# Altium PCB TZ-SB-0001-PCB-[A] (HydroScope Mainboard).PcbDoc (part 3 of 4)
Units mil, origin at the board's own origin, x right, y up, seen from the top; angles counter-clockwise.
Board outline 4500 x 970 mil, 4 copper layers (Top Layer, GND-PWR, GND, Bottom Layer), stack 64.112 mil thick; 165 components, 114 nets, 573 pads, 320 vias.
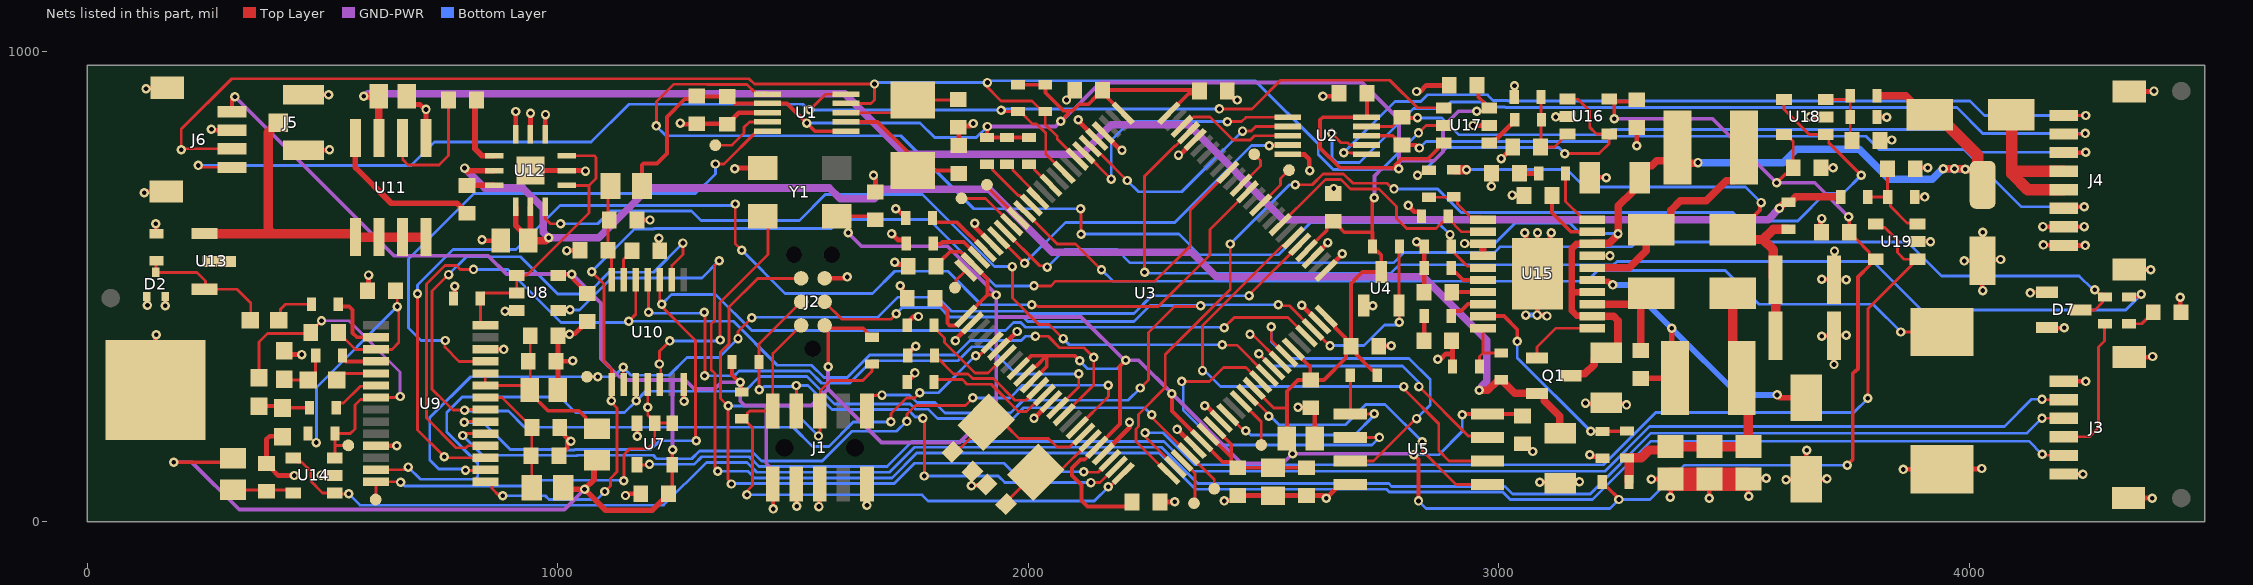
[diagram p4: the nets of this part, all layers, seen from the top]

## Via types
v1: diameter 20, hole 10, Top Layer to Bottom Layer, tented both sides, 320 vias

## Nets (pads, with @x,y where several pads share a name; then routed paths per layer and width w, separated by ;. In a path a pad name is that pad's centre, name@x,y a point inside that pad or via, vN(x,y) a via of type N, cw(c..) or ccw(c..) an arc to the next point about the centre after c; other vN are vias at no path point)
+3.3v: C1.2 C2.2 C3.2 C6.1 C7.2 C8.2 C9.2 C10.2 C11.2 C12.2 C13.2 C14.2 C16.2 C18.2 C19.2 C20.2 C21.2 C22.2 C23.2 C58.2 C59.2 C62.2 C63.2 J1.1 J2.1 J6.4 L1.1 L2.2 L3.1 L4.2 R2.2 R3.2 R4.1 R5.1 R6.1 R8.2 R9.2 R15.2 R16.2 R17.2 R27.1 U1.1 U1.7 U2.10 U3.1 U3.9 U3.10 U3.11 U3.21 U3.31 U3.32 U3.33 U3.39 U3.45 U3.50 U3.54 U3.75 U3.76 U3.99 U4.3 U5.8 U7.5 U8.5 U16.5 U17.3 U17.6 U18.5 U19.5 Y1.4 | length 15735.5
  Top Layer w6: U3.39@2479.67,283.17 2521.37,241.47 2549.47,241.47 ; U18.5@3605.71,822.6 3610.63,822.6 3625.46,807.77 C62.2@3625.46,752 ; C63.2@3744.54,615 3744.54,613.03 3757.29,600.28 3759.25,600.28 3786.98,572.56 3786.98,566.41 3795.79,557.6 U19.5@3800.71,557.6
  Top Layer w8: v1(184,126) 301.67,126 L4.2@310,134.33 ; J6.4@307.64,871.06 307.64,896.64 v1(314,903) ; U8.5@1001.29,523.4 1002.89,525 1029,525 v1(1030,526) ; L3.1@1011.46,72 L3.1@1027.43,87.97 ; 1032.3,515.24 1049.28,498.25 1049.28,496.29 1061.03,484.54 C23.2@1063,484.54 ; L2.2@1179,713 1179,758 1182,761 1211,761 1232,782 1232,860 1269.97,897.97 1288.43,897.97 C2.2@1295,904.54 1296,903.54 C1.2@1360,903.54 1361.97,903.54 1376.82,888.68 U1.7@1445.34,888.68 1487.31,888.68 v1(1529,847) 1546.37,829.63 U1.1@1612.66,829.63 ; C22.2@1235.54,59 1243.4,66.86 U7.5@1243.4,120.71 1243.4,147.4 1244,148 v1(1244,152.79) ; R16.2@1370.46,338.85 1370.46,311.54 1389.3,292.7 1389.3,277.24 R17.2@1391,275.54 ; J1.1@1457,80 1458,79 v1(1458,27) ; v1(1575,329) 1575,402.78 1567,410.78 J2.1@1567,417 1573.22,417 1579.45,410.78 1648.77,410.78 1656.7,402.84 1656.7,397.92 1662.54,392.08 R15.2@1667.46,392.08 ; v1(1617,614) 1617,627.41 1595.41,649 1667.46,649 C3.2@1675,641.46 ; C7.2@1801.54,475 1801.54,473.03 1813.29,461.28 1815.25,461.28 1828,448.54 1828,421.57 1832.69,416.89 1845.13,416.89 1864.52,436.28 U3.1@1867.22,436.28 1913,482.07 ; C14.2@1814.54,541 1814.54,554.72 1833.39,573.57 1855.2,573.57 U3.99@1881.14,547.64 1913,515.77 1913,482.07 ; v1(1913,839.69) 1912,838.69 R4.1@1912,816.54 R5.1@1955,816.54 R6.1@2001,816.54 ; v1(1932,481.54) 1931.47,482.07 1913,482.07 ; R3.2@1978,928.54 R2.2@2036,928.54 2036.61,927.93 2036.61,911.39 2070,878 2070,877.69 2074.69,873 2084.34,873 ; U3.9@1978.57,324.93 2006.41,352.77 2039,352.77 ; U3.10@1992.49,311.01 1995.19,311.01 2014.17,330 2016.23,330 2039,352.77 ; U3.11@2006.41,297.09 2039,329.68 2039,352.77 ; v1(2069,851) 2084.34,866.34 2084.34,873 ; v1(2109,342) 2098.23,352.77 2039,352.77 ; U3.76@2201.28,867.78 2169.29,899.78 2169.29,903.28 C13.2@2157.54,915.03 ; v1(2207,343) 2195,331 2195,207.29 U3.21@2145.6,157.89 2119.71,132 2110.72,132 2093,114.28 2093,98.11 2113,78.11 2113,44.72 2125.72,32 2220.46,32 C8.2@2220.46,50.39 ; U3.75@2298.72,867.78 2340.4,909.47 2357.93,909.47 C12.2@2363.46,915 2361.46,917 C13.2@2157.54,917 C13.2@2157.54,915.03 ; v1(2305,272) 2305,235.28 2336,204.28 2336,204.13 U3.31@2368.32,171.81 2413.13,127 2426.6,127 2427.31,126.29 C9.2@2431.28,126.29 ; U3.32@2396.15,171.85 2431.28,136.72 ; U3.33@2396.15,199.65 2431.28,164.52 2431.28,136.72 ; v1(2561.47,144.1) 2561.47,165.01 C20.2@2549.47,177 2549.47,241.47 2549.47,277.28 2573.19,301 C21.2@2600,301 ; U3.45@2563.19,366.68 2563.19,364.81 2597,331 2599,331 2599,302 C21.2@2600,301 ; C19.2@2591.03,114.54 C18.2@2520,114.53 C9.2@2445,114.54 2433.25,126.29 C9.2@2431.28,126.29 ; U3.54@2591.03,575.48 2591.03,576.24 2616,601.22 2616,601.28 2627.72,613 2628.55,613 2634.28,618.73 2634.28,626.71 2646.03,638.46 C11.2@2648,638.46 2649.97,638.46 2661.72,626.71 2661.72,624.75 2671.46,615 2731,615 ; U3.50@2632.78,436.28 2632.78,433.59 2651.48,414.9 2651.48,412.24 2673.71,390.01 2673.71,384.13 C10.2@2685.46,372.39 ; C6.1@2719.52,910 2719.52,860.23 U2.10@2718.66,859.37 2718.5,859.53 2625.53,859.53 2620,854 2620,794.03 2662.03,752 2773.64,752 2773.95,751.69 2785.74,751.69 v1(2787.4,750.03) ; 2731,616 2731,683.7 v1(2735.3,688) ; 2731.46,614.54 R8.2@2731.46,585 2731.46,580.08 2737.3,574.24 2742.22,574.24 2750,566.46 U4.3@2750,530.43 2709.57,530.43 2685.46,506.33 C10.2@2685.46,372.39 ; R9.2@2741.14,311.01 2741.14,315.93 2735.3,321.77 2730.38,321.77 2697.21,354.94 2697.21,360.64 C10.2@2685.46,372.39 ; 2779.54,757.9 2792.64,771 2849.17,771 2870.04,791.87 2870.04,796.79 2877.85,804.6 U17.6@2882.77,804.6 ; v1(2819,142) 2829,132 v1(2829,44) ; v1(2922,227) 2924,229 U5.8@2975.67,229 3045.54,229 C16.2@3050,224.54 ; C58.2@2953.54,927 2956.66,923.88 2956.66,901.97 2966.5,892.13 2966.5,887.21 U17.3@2974.31,879.4 ; R27.1@3219.46,84 3219.46,79.08 3225.3,73.24 3230.22,73.24 3255,48.46 v1(3255,47) ; U16.5@3234.29,893 U16.5@3245,893 ; v1(3245,856) U16.5@3245,893 ; C59.2@3293,896.54 3289.46,893 U16.5@3245,893 ; v1(3590,720) 3608.28,738.28 3613.71,738.28 3625.46,750.03 C62.2@3625.46,752 ; v1(3740,120) 3752,132 3752,315 3757,320 3758.31,320 3763,324.69 3763,519.89 3787.98,544.87 3787.98,549.79 U19.5@3795.79,557.6 ; v1(3743,648) 3743,646 3744.54,644.46 C63.2@3744.54,615 ; 2084.34,873 2094,873 2108,887 2127.54,887 2143.82,903.28 2145.79,903.28 C13.2@2157.54,915.03 ; C9.2@2431.28,126.29 2431.28,136.72 ; C21.2@2600,301 2628,301 2675.21,348.21 2675.21,362.13 C10.2@2685.46,372.39
  Top Layer w12: L3.1@1011.46,72 1014.46,69 v1(1057,69) ; L1.1@1083,130.54 1077.09,130.54 1077.09,89.09 v1(1057,69) ; C22.2@1235.54,59 1235.54,57.03 1225.79,47.28 1223.82,47.28 1200.54,24 1102,24 v1(1057,69)
  GND-PWR w8: v1(184,126) 223,126 323,26 1014,26 v1(1057,69) ; v1(314,903) 652,565 852,565 891,526 v1(1030,526) 1092,464 1092,346.72 1130.72,308 1136,308 1143,301 1244,301 ; v1(1244,152.79) 1244,301 ; v1(1458,27) 1458,109 1443,124 1443,246 ; v1(1575,329) 1574,328 1574,282 ; v1(1617,614) 1646,585 1828.54,585 v1(1932,481.54) 1932,435 ; v1(1913,839.69) 2057.69,839.69 v1(2069,851) 2071,851 2153,933 2709,933 2787.4,854.6 2787.4,767 ; v1(2735.3,688) 2735.3,734.33 2751,750.03 v1(2787.4,750.03) 2787.4,767 ; v1(2819,142) 2816.9,144.1 v1(2561.47,144.1) 2541.37,124 2453,124 v1(2305,272) 2234,343 v1(2207,343) 2204,343 2112,435 1932,435 ; v1(2953,872) 2914,872 2881,839 2881,786 2862,767 2787.4,767 ; v1(3245,856) 3454,856 v1(3590,720) 3671,720 v1(3743,648) ; 1244,301 1271,301 1290,282 1333.23,282 1347.23,296 v1(1388,296) 1388,256 1397,247 1442,247 1443,246 ; 1443,246 1443,247 1539,247 1574,282 ; 1574,282 1688,168 1854,168 1932,246 1932,435
  Bottom Layer w6: v1(1529,847) 1770,847 1801,816 1889.31,816 v1(1913,839.69) ; v1(2109,342) 2126,325 2189,325 v1(2207,343) ; v1(2819,142) 2872,142 2922,192 v1(2922,227) ; v1(2829,44) 2845,28 3236,28 v1(3255,47) 3321,47 3394,120 v1(3740,120)
+3.3v+_TDC1000: C24.2 C25.2 C26.2 L1.2 U9.23 U9.24 | length 423.2
  Top Layer w6: U9.24@846,314.95 U9.23@846,289.36 846.21,289.57 930.9,289.57 C26.2@940.47,280 941.46,280.99 941.46,341 C25.2@941.46,395
  Top Layer w8: C26.2@940.47,280 940.47,274.09 978.94,235.62 1044.84,235.62 1059.44,221.02 1059.44,215.12 1077.09,197.46 L1.2@1083,197.46
+3.3v+_TDC7200: C27.2 C28.2 L2.1 U10.14 | length 204.6
  Top Layer w6: L2.1@1112.07,713 1106.54,707.47 C27.2@1106.54,577 1114.43,569.1 U10.14@1114.43,514
+HV: C29.2 R24.1 R41.2 U11.3 | length 3443.2
  Top Layer w16: v1(588,904) C29.2@619.94,904 620,903.94 U11.3@620,815.31 ; v1(3596,665.94) 3606.76,676.7 3613.16,676.7 R24.1@3615,678.54 3619.92,678.54 3621.76,680.39 3621.76,680.63 3631.14,690 R41.2@3726.46,690
  GND-PWR w16: v1(588,904) 591,904 596,909 1610,909 1738,781 2114,781 2176,843 2341,843 2542,642 3572.06,642 v1(3596,665.94)
+HV_PRE: C44.1 C47.2 D4.2 R24.2 R25.2 | length 1125.9
  Top Layer w8: D4.2@3496.61,620 3512.36,620 3554.7,662.34 3554.7,675.7 v1(3557,678)
  Top Layer w20: R25.2@2904,747.54 2930.54,747.54 v1(2931,748) ; D4.2@3496.61,620 3516.97,599.64 3561.36,599.64 ; C44.1@3587.99,395 C47.2@3587.99,514 3583.31,518.68 3583.31,577.69 3561.36,599.64 ; R24.2@3615,621.46 3583.17,621.46 3561.36,599.64
  Bottom Layer w6: v1(2931,748) 3145,748 3182,711 3524,711 v1(3557,678)
+MOS_DRV: C40.2 C57.2 Q1.2 R35.2 U12.8 U12.10 U12.11 | length 3087.4
  Top Layer w12: v1@808.44,746 U12.8@865.23,746 ; U12.10@910.5,669.23 910.5,629.93 937.53,602.91 C40.2@937.53,597 942,601.47 U12.11@942,669.23
  Top Layer w16: v1(802,751.36) 803.08,751.36 v1@808.44,746 ; C40.2@937.53,597 973.92,597 979.92,603 v1(981,603) ; v1(2958,279) 2976.67,279 2997.28,299.61 3003.16,299.61 R35.2@3005,301.46 3009.92,301.46 3011.76,299.61 3011.76,294.69 3033.86,272.6 Q1.2@3081.11,272.6 3092.92,272.6 3096.73,268.79 3096.73,256.98 3129.28,224.43 3129.28,188.87 C57.2@3130,188.15
  GND-PWR w16: v1(802,751.36) 844.36,709 926,709 969,666 969,615 v1(981,603) 1087,603 1193,709 1577,709 1600,686 1673,686 1693,706 1917,706 2051,572 2347,572 2399,520 2839,520 2974,385 2974,298.36 2963.39,287.75
+V_ADJ: R26.1 U16.1 U16.4 | length 637.5
  Top Layer w6: v1(2827,736) 2831,736 2839.93,744.93 2838.33,746.54 R26.1@2851,746.54 ; v1(3140,782) 3213,782 3234.29,803.29 U16.4@3234.29,823.6 3207.4,823.6 3192.85,838.15 3192.85,872.54 3167.93,897.47 3146.64,897.47 U16.1@3145.71,898.4
  Bottom Layer w6: v1(2827,736) 2831,736 2890,795 3127,795 v1(3140,782)
+VIN: D3.1 J4.4 J4.5 | length 361.3
  Top Layer w24: D3.1@4088.61,865 4090,863.61 4090,806 4090,744.68 ; J4.5@4200.36,705.31 4123.69,705.31 4090,739 4090,744.68 ; J4.4@4200.36,744.68 4090,744.68
BUFFERED_RX: J3.3 U14.1 U14.4 | length 3993
  Top Layer w6: U14.4@437.71,135.51 446.52,126.7 455.76,126.7 475,107.46 475,86 500.3,60.7 U14.1@526.29,60.7 528,59 v1(556,59) ; v1(4154,220) 4154.32,219.68 J3.3@4200.36,219.68
  Bottom Layer w6: v1(556,59) 580,35 1224.97,35 1315.97,126 1401.93,126 1422.93,105 1704.97,105 1757.97,158 2282.97,158 2360.11,80.86 2766.05,80.86 2771.91,75 3013,75 3029,59 3194.03,59 3323.03,188 4122,188 v1(4154,220)
BUFFERED_STOP: J3.2 U7.4 | length 3159.6
  Top Layer w6: U7.4@1168.6,120.71 1193.71,120.71 v1(1195,122) ; v1(4154,260) 4154.94,259.05 J3.2@4200.36,259.05
  Bottom Layer w6: v1(1195,122) 1195.21,121.79 1289.82,121.79 1306.03,138 1406.9,138 1427.9,117 1700,117 1753,170 2287.94,170 2350.94,107 3225.06,107 3320.06,202 4074,202 4132,260 v1(4154,260)
BZR: U3.91 U6.1 | length 2074.2
  Top Layer w6: U3.91@1992.49,658.99 2061.5,589.98 2100.51,589.98 v1(2155.49,535) ; v1(3854,403) 3854.33,402.67 U6.1@3942,402.67
  Bottom Layer w6: v1@2156,535 2180,511 3187,511 3210,534 3481,534 3553,462 3795,462 v1(3854,403)
CS_TDC1000: U3.18 U9.19 | length 1652.2
  Top Layer w6: v1(798,183) 802,187 U9.19@846,187 ; v1(1742,213) 1742,229 1760,247 1866.13,247 1882,262.87 v1(1882,263) ; U3.18@2103.85,199.65 2170,265.81 v1(2170,290)
  Bottom Layer w6: v1(798,183) 840,141 1014.16,141 1015.16,140 1040.84,140 1041.84,141 1202.87,141 1210.08,133.79 1284.85,133.79 1301.06,150 1411.87,150 1432.87,129 1561.97,129 1624.97,192 1720.13,192 1741.13,213 v1(1742,213) ; v1(1882,263) 1961,263 1988,290 v1(2170,290)
CS_TDC7200: U3.15 U10.11 | length 1282.8
  Top Layer w6: U10.11@1191.2,514 1193,512.2 v1(1193,445) ; v1(1311,445) 1313,443 v1@1313,310 ; U3.15@2062.09,241.41 2107,286.32 v1(2107,314)
  Bottom Layer w6: v1(1193,445) 1195,443 1309,443 v1(1311,445) ; v1(1312,310) 1375.13,310 1385.49,320.36 1534.58,320.36 1560.94,294 1620,294 1668,342 1850.36,342 1880.13,371.77 1916.23,371.77 1974,314 v1(2107,314)
DC_DC_SYNC: R32.2 U1.6 U15.5 | length 2299.5
  Top Layer w6: v1(1209,840.86) 1210,841.86 1210,893 1246.29,929.29 1316.73,929.29 1317.01,929 1402,929 1419.72,911.28 1442.43,911.28 U1.6@1445.34,908.37 ; v1(2111,665) 2112,664 v1(2112,611) ; v1(2896,610) 2897,609 2897,586.54 R32.2@2898.54,585 2905.39,578.16 2905.39,570.4 2932.92,542.86 2962.2,542.86 U15.5@2965.97,539.09
  Bottom Layer w6: v1(1209,840.86) 1229.86,820 1728.97,820 1883.97,665 v1(2111,665) ; v1(2112,611) 2320,611 2364,567 2531,567 2600,636 2870,636 v1(2896,610)
DC_DC_VIN: C45.2 C46.2 C48.1 D3.2 L5.1 Q1.3 R39.2 U15.3 U15.4 U15.12 U15.14 U15.18 | length 2359.2
  Top Layer w8: v1(2927,591) 2930,591 2930.72,590.28 U15.3@2965.97,590.28
  Top Layer w14: U15.12@3197.39,437.59 3165.41,437.59 3155,448 3155,487.4 ; U15.14@3197.74,487.4 3155,487.4 ; U15.18@3198.25,590.28 3164.68,590.28 3155,580.59 3155,487.4
  Top Layer w16: U15.4@2965.97,564.68 U15.3@2965.97,590.28 ; Q1.3@3151.98,310 3155.79,313.81 3182.66,313.81 3202.54,333.68 3202.54,345.5 3216.19,359.15 C45.2@3228,359.15 3239.35,359.15 3253,372.8 3253,427.36 3243.63,436.73 U15.12@3198.25,436.73 U15.12@3197.39,437.59 ; U15.14@3197.74,487.4 U15.14@3198.25,487.91 ; U15.18@3198.25,590.28 3199.11,591.13 3234.13,591.13 3254,611 3254,671 3285.5,702.5 3285.5,717.35 C46.2@3299.15,731 3299.15,742.81 3312.8,756.46 3324.61,756.46 3334.98,766.83 3357.61,766.83 L5.1@3379.13,788.36 ; L5.1@3379.13,795 L5.1@3379.13,788.36 ; v1(3423,763) 3422,762 3400.66,762 3379.13,783.53 L5.1@3379.13,788.36 ; R39.2@3803.54,905 3864.8,905 3874.17,895.63 3874.17,890.46 3899.64,865 D3.2@3915.39,865 ; v1(3944,750) v1(3968,750) 3988.92,750 3989.92,749 v1(3991,749) 3991.77,748.23 4008.88,748.23 C48.1@4008.88,752.18 ; C48.1@4028,715.71 C48.1@4028,733.06
  Top Layer w24: D3.2@3915.39,865 3931.13,865 3952.6,843.54 3952.6,843.4 4017.36,778.64 4017.36,726.35 C48.1@4028,715.71
  Bottom Layer w6: v1(2927,591) 2991,591 3034,634 3150.73,634 3172.73,612 v1(3253,612)
  Bottom Layer w16: v1(3423,763) 3604.33,763 3632.33,791 3766,791 3829,728 3920.94,728 3942.94,750 v1(3944,750) v1(3968,750) 3993.97,750 3992.97,749 v1(3991,749)
FLOAT: U13.2
GND: C1.1 C2.1 C3.1 C4.1 C5.1 C6.2 C7.1 C8.1 C9.1 C10.1 C11.1 C12.1 C13.1 C14.1 C15.1 C16.1 C17.1 C18.1 C19.1 C20.1 C21.1 C22.1 C23.1 C24.1 C25.1 C26.1 C27.1 C28.1 C29.1 C30.2 C31.1 C32.1 C37.1 C40.1 C41.2 C42.1 C43.1 C44.2 C45.1 C46.1 C47.1 C48.2 C50.1 C51.1 C52.1 C53.1 C54.1 C55.1 C56.1 C57.1 C58.1 C59.1 C60.1 C61.1 C62.1 C63.1 C64.1 D1.C D2.1 D2.2 D6.1 D7.1 D7.2 HW1.1 J1.3 J1.5 J1.9 J2.5 J3.1 J3.6 J3.M1 J3.M2 J4.7 J4.8 J4.M1 J4.M2 J5.1 J5.2 J6.3 J6.M1 J6.M2 R10.1 R11.1 R12.1 R13.1 R14.1 R18.2 R23.1 R29.1 R30.1 R31.1 R32.1 R36.1 R38.1 R40.1 R42.1 U1.8 U2.5 U3.2 U3.6 U3.14 U3.22 U3.30 U3.34 U3.43 U3.49 U3.51 U3.53 U3.71 U3.79 U3.80 U3.96 U4.1 U5.4 U6.2 U7.3 U8.3 U9.11 U9.26 U10.7 U11.1 U12.2 U12.4 U12.5 U12.6 U12.13 U14.2 U15.17 U15.21 U16.2 U17.2 U18.2 U19.2 Y1.2 | length 7168.9
  Top Layer w6: v1(2471,398) 2476.19,398 U3.43@2535.35,338.85
  Top Layer w10: v1(121,699) 122,699 123.79,700.79 167.39,700.79 J6.M1@168.36,701.76 ; v1(125,920) 125.76,920.76 168.85,920.76 J6.M2@170.33,922.24 ; D2.1@126.31,478.41 127.52,477.21 127.52,460.48 v1(128,460) ; HW1.1@145,280 145,395 v1(147,397) ; v1(146,633) 147,632 R23.1@147,611.54 ; D2.2@165.68,478.41 166.2,477.89 166.2,459.2 v1(166,459) ; v1(264,834) 266.31,831.69 J6.3@307.64,831.69 ; C37.1@419,355 v1(456,355) ; C41.2@425.75,192.21 415,181.46 387.86,181.46 381,174.6 C43.1@381,123.52 382.97,123.52 393.72,112.77 393.72,110.8 406.52,98 v1(440,98) ; J5.2@459.57,788.94 513.94,788.94 v1(515,790) ; J5.1@459.57,907.06 459.63,907 v1(513,907) ; v1(497,99) 497.89,98.11 U14.2@526.29,98.11 ; C42.1@596,491 598,493 v1(598,524) ; U9.11@613.72,161.41 657.59,161.41 v1(658,161) ; C29.1@679,904 679,900.94 693.69,886.26 707.74,886.26 v1@720,874 ; U11.1@720,815.31 v1@720,874 ; v1(720,876) v1@720,874 ; R18.2@778.46,474 781,476.54 v1(781,500) ; v1(839,599) 841,599 843,597 C40.1@878.47,597 ; U9.26@846,366.13 884.87,366.13 v1(885,366) ; v1(888,447) 911.11,447 U8.3@912.71,448.6 ; U12.6@910.5,822.77 v1(910.5,871.5) ; U12.13@942,746 U12.2@1018.77,746 1058,746 v1(1059,745) ; U12.5@942,822.77 v1(942,868) ; U12.4@973.5,822.77 973.5,864.5 v1(974,865) ; C24.1@996.52,341 C24.1@1000.52,341 ; C26.1@999.53,280 1000.52,280.99 C24.1@1000.52,341 ; C32.1@1002.52,140 1020,157.48 1020,171 v1(1028,171) ; C31.1@1004.03,200 1014.78,189.25 1014.78,182.93 1020.09,177.62 v1@1020.09,171.09 ; v1(1019,576) 1046.48,576 C27.1@1047.48,577 ; v1(1032,342) 1031,341 C24.1@1000.52,341 ; C23.1@1063,425.48 1061.03,425.48 1050.28,414.73 1050.28,412.77 1037.43,399.91 1026.91,399.91 v1(1025,398) 1003.52,398 C25.1@1000.52,395 C24.1@1000.52,341 ; v1(1144,55.47) 1147.53,59 C22.1@1176.48,59 ; C28.1@1168.52,641 v1(1196,641) v1@1197,640 ; U7.3@1168.6,209.29 1168.6,182.4 1169,182 v1(1169,181.46) ; v1(1215,602) 1214,601 1214,578.01 C30.2@1216.54,575.48 ; v1(1260,847) 1261.91,845.09 1268.4,845.09 1269,844.48 1294,844.48 C2.1@1295,845.48 1359,845.48 C1.1@1360,844.48 1361.97,844.48 1372.72,855.23 1372.72,857.2 1384.52,869 U1.8@1445.34,869 ; U10.7@1267.98,291.56 1267.98,256.42 v1(1268.4,256) ; v1(1376,750.03) 1377.33,751.36 Y1.2@1435.52,751.36 ; J1.3@1507,80 1507.64,79.36 1507.64,33.36 v1(1508,33) ; v1(1555,32) 1556.36,33.36 1556.36,79.36 J1.5@1557,80 ; J2.5@1567,517 1612,517 v1(1615,520) ; v1(1657,35) 1659,37 1659,78 J1.9@1657,80 ; v1(1671,736) 1675,732 C3.1@1675,700.52 ; v1(1709.28,611.72) 1722.46,598.54 1735.9,598.54 1740.74,593.7 R10.1@1740.74,591 ; v1(1716.13,550.97) 1720.72,546.38 1741.2,546.38 C14.1@1744.61,542.97 ; v1(1718,665.07) 1719.46,665.07 1729.69,654.84 1734.61,654.84 1739.46,649.99 R11.1@1739.46,645.07 ; v1(1728,501) 1731.73,497.27 1731.73,485.75 C7.1@1742.48,475 ; R13.1@1742.46,297 1759,313.54 v1(1759,316) ; R14.1@1742.46,417.31 1742.46,422.24 1756.22,436 v1(1766.46,436) ; R12.1@1743.46,353 1743.46,357.92 1748.3,362.76 1750.14,362.76 1760.38,373 v1(1761,373) ; v1(1845.09,384.54) 1845.09,386.31 U3.2@1881.14,422.36 ; C4.1@1852,799.06 1852,837.27 C5.1@1851,838.27 1853.59,840.86 1877.86,840.86 v1(1883,846) ; v1(1879,76) 1880.48,77.48 1909.74,77.48 C15.1@1911.13,78.87 ; v1(1886,634) 1886,626.29 U3.96@1922.89,589.4 ; U3.6@1936.81,366.68 1938.09,366.68 1957.73,386.32 1958.32,386.32 v1(1976,404) ; v1(2012,220) 2013,221 2013.84,221 U3.14@2048.17,255.33 ; v1(2081,896) 2081,897 2087.73,903.73 2087.73,906.25 C13.1@2098.48,917 ; v1(2106,853.86) 2106,851.71 U3.80@2145.6,812.11 ; U3.22@2159.52,143.97 2214.82,199.27 2214.82,210.82 v1(2215,211) ; U3.79@2159.52,826.03 2196.55,789 v1(2199,789) ; C8.1@2279.43,41.61 2310.31,41.61 v1(2310.91,42.21) ; v1(2316,196) 2316.29,196 U3.30@2354.4,157.89 ; v1(2319,779) 2321.29,779 U3.71@2354.4,812.11 ; v1(2375,246) 2377.64,246 U3.34@2410.07,213.57 ; v1(2416,44) 2420,44 2420.9,44.9 2434.42,44.9 C9.1@2445,55.48 ; C12.1@2422.52,915 2422.52,913.03 2437.64,897.91 2442.09,897.91 v1(2444,896) ; C9.1@2445,55.48 C18.1@2520,55.47 ; C18.1@2520,55.47 C19.1@2591.03,55.48 2627.16,55.48 v1(2632.78,49.86) 2653.9,70.97 2653.9,72.19 2660.71,79 U5.4@2684.33,79 ; U2.5@2551.34,780.63 2551.65,780.31 2586.69,780.31 2597,770 2597,747 v1(2598,746) ; v1(2573,243) 2573.14,242.86 2599.09,242.86 C21.1@2600,241.94 2608.53,233.42 C20.1@2608.53,177 ; v1(2581,460) 2581.23,460 U3.49@2618.86,422.36 ; U3.53@2604.95,561.56 2636,592.61 v1(2636,593) ; v1(2626,904) 2654.46,904 C6.2@2660.46,910 ; U3.51@2632.78,533.72 2667,567.93 v1(2667,569) ; U4.1@2712.6,459.57 2713.17,459 v1(2732,459) ; C10.1@2744.52,372.39 2745.52,373.39 2770.39,373.39 v1(2771,374) ; v1(2807,672) 2820.24,658.76 2830.61,658.76 2835.46,653.92 R29.1@2835.46,649 ; v1(2825,595) 2833.27,586.73 2839.73,586.73 R32.1@2841.46,585 R30.1@2841.46,539.09 2841.46,488.38 C54.1@2840.48,487.4 ; v1(2825,914) 2833,914 2846,927 C58.1@2894.48,927 ; v1(2870,345) 2876,345 2887.3,356.3 2901.46,356.3 ; C56.1@2899.52,384.54 2901.46,382.6 2901.46,356.3 ; R36.1@2901.46,330 2901.46,356.3 ; v1(2945,842) U17.2@2979.23,842 ; v1(2984,713) 2984,739.52 C55.1@2984.48,740 ; v1(3005,771.52) 3016.77,783.28 3018.73,783.28 3029.48,794.03 C60.1@3029.48,796 ; v1(3028,694) 3029,693 C53.1@3053.48,693 ; R38.1@3032.46,902 3035,904.54 3035,924 v1(3033,926) ; C16.1@3050,165.48 3051.97,165.48 3068.45,149 v1(3072,149) ; v1(3055,614) 3057.57,611.43 3057.57,550.83 U15.21@3081.72,526.69 ; v1(3082,614) 3082,611.28 3081.72,611 U15.21@3081.72,526.69 ; v1(3087,84) 3087.39,83.61 3128.24,83.61 C57.1@3130,81.85 3132.79,84.64 v1(3171,84.64) ; v1(3102,437) 3100,439 v1(3081,439) 3082.11,440.11 U15.21@3082.11,526.3 ; v1(3111,614) 3108.43,611.43 3108.43,552.61 U15.21@3082.11,526.3 ; v1(3121,860) 3144.71,860 U16.2@3145.71,861 ; v1(3184,252) 3185.39,250.61 C45.1@3230.24,250.61 ; C46.1@3192.85,731 3193.5,731.65 3227.35,731.65 v1(3228,731) ; v1(3193,142) 3197.36,137.64 3216.82,137.64 R31.1@3220,134.46 ; U15.17@3198.25,564.68 3235.68,564.68 v1(3236,565) ; C45.1@3228,252.85 C45.1@3230.24,250.61 ; v1(3271,248) 3268.61,250.39 3230.46,250.39 C45.1@3230.24,250.61 ; v1(3293,799) C59.1@3293,837.48 ; v1(3324,90) 3324.55,90.55 C51.1@3365,90.55 3365,54 3364,53 v1(3364,52) ; v1(3447,50) C50.1@3447,90.55 ; v1(3531,54) 3529.8,55.2 3529.8,90.35 C52.1@3530,90.55 3566.55,90.55 v1(3568,92) ; v1(3610,89) 3610.39,89.39 3652.01,89.39 D6.1@3653,90.39 ; v1(3654,152) 3653,151 D6.1@3653,90.39 ; v1(3661,860) U18.2@3694.29,860 ; C62.1@3684.52,752 v1(3710,752) ; C63.1@3685.48,615 3683.14,617.34 3683.14,641.14 v1(3686,644) ; v1(3686,394) 3687,395 C44.2@3712.01,395 ; v1(3686,515) 3711.01,515 C47.1@3712.01,514 ; v1(3697,91) 3696.39,90.39 D6.1@3653,90.39 ; v1(3712,334) 3711.68,334.32 3711.68,394.67 C44.2@3712.01,395 ; v1(3713,575) 3713,514.99 C47.1@3712.01,514 ; v1(3738,396) 3713.01,396 C44.2@3712.01,395 ; v1(3738,514) 3737.59,513.59 3712.42,513.59 C47.1@3712.01,514 ; R40.1@3803.54,860 3823.46,860 v1(3824,859.46) ; C61.1@3809.52,810 3809.93,810.41 3834.41,810.41 v1(3835,811) ; v1(3859,111) 3859.33,111.33 U6.2@3942,111.33 3942.74,112.07 4025.07,112.07 v1(4026,113) ; R42.1@3883.54,690 v1(3905,690) ; C64.1@3884.52,750 3886.52,752 v1(3911,752) ; U19.2@3889.29,595 3890.29,596 3916,596 v1(3917,595) ; v1(3989,554) 3989.29,554.29 C48.2@4028,554.29 ; v1(4028,491) 4027,492 4027,553.29 C48.2@4028,554.29 ; v1(4028,615) C48.2@4028,554.29 ; v1(4066,557) 4030.71,557 C48.2@4028,554.29 ; v1(4129,486) 4130.4,487.4 D7.1@4164.57,487.4 ; v1(4156,627) 4156.43,626.57 J4.7@4200.36,626.57 4241.57,626.57 4242,627 v1(4244,627) ; v1(4157,588) 4160,588 4160.71,587.29 4200.28,587.29 J4.8@4200.36,587.2 4200.57,587 v1(4246,587) ; D7.2@4164.57,412.6 4166.17,411 4196,411 4197,412 v1(4201,412) ; J3.6@4200.36,101.57 4200.94,101 v1(4241,101) ; J3.1@4200.36,298.43 4246.57,298.43 v1(4247,298) ; J3.M2@4337.67,50.39 4387.61,50.39 v1(4388,50) ; J3.M1@4339.64,349.61 4387.61,349.61 v1(4389,351) ; J4.M2@4339.64,536.02 4383.98,536.02 v1(4385,535) ; J4.M1@4339.64,913.98 4390.98,913.98 v1(4392,915) ; v1(4447.53,477) 4447.53,447 D1.C@4449.53,445 ; U15.21@3081.72,526.69 U15.21@3082.11,526.3
  Top Layer w50: C51.1@3365,90.55 C50.1@3447,90.55 C52.1@3530,90.55
  Bottom Layer w10: v1(3057,439) v1(3081,439)
  other v1: 2649,708
HV_ENABLE: R29.2 U3.58 U15.2 | length 553.5
  Top Layer w6: U3.58@2535.35,631.15 2608.19,704 2608.29,704 2631.29,727 2664.71,727 2684.71,707 2745.18,707 2782.65,669.54 2782.65,644.35 2804,623 2866.54,623 2880.78,637.24 2885.7,637.24 R29.2@2892.54,644.08 ; R29.2@2892.54,649 R29.2@2892.54,644.08 ; U15.2@2965.97,615.87 2920.76,615.87 R29.2@2892.54,644.08
HV_MONITOR: U3.27 U19.1 U19.4 | length 2194.4
  Top Layer w6: v1(2248,189) 2249.91,187.09 2249.91,178.86 U3.27@2312.64,116.14 ; v1(3784,262) 3784,452.31 3877.56,545.87 3877.56,550.79 U19.1@3884.37,557.6 ; U19.4@3800.71,632.4 3807.52,625.59 3819.41,625.59 3847,598 3847,571.68 3861.09,557.6 U19.1@3884.37,557.6 ; U19.1@3889.29,557.6 U19.1@3884.37,557.6
  Bottom Layer w6: v1(2248,189) 2285.91,189 2353.91,121 3222.09,121 3333.09,232 3754,232 v1(3784,262)
HV_ON: U3.41 U12.12 | length 1804.3
  Top Layer w6: U12.12@973.5,669.23 U12.12@973.5,669.23 973.46,644.06 984.51,633 v1(1006,633) ; v1(1966,542) 1966,475.13 2022.13,419 2044,419 v1(2074,389) ; v1(2412,376) 2413,375 2443,375 2506.99,311.01 U3.41@2507.51,311.01
  Bottom Layer w6: v1(1006,633) 1085,633 1112,660 1284.5,660 1304.5,640 1513.36,640 1568.36,695 1775,695 1928,542 v1(1966,542) ; v1(2074,389) 2087,376 v1(2412,376)
ISP0: R6.2 U3.87 | length 68.6
  Top Layer w6: R6.2@2001,759.46 2005.92,759.46 2012.76,752.61 2012.76,747.69 2045.79,714.67 U3.87@2048.17,714.67
ISP1: R5.2 U3.89 | length 102.6
  Top Layer w6: R5.2@1955,759.46 1959.92,759.46 1966.76,752.61 1966.76,747.16 2003.63,710.29 2003.63,703.54 U3.89@2020.33,686.83
ISP2: R4.2 U3.90 | length 133.1
  Top Layer w6: R4.2@1912,759.46 1916.92,759.46 1923.76,752.61 1923.76,747.69 1978.41,693.05 1982.17,693.05 2002.3,672.91 U3.90@2006.41,672.91
ISP_RX_IN: U2.1 U3.82 | length 559.3
  Top Layer w6: U3.82@2117.77,784.27 2119.73,784.27 v1(2176,728) ; v1(2423,850) 2453,850 2462.18,859.18 2551.15,859.18 U2.1@2551.34,859.37
  Bottom Layer w6: v1(2176,728) 2176,810 2216,850 v1(2423,850)
ISP_TX_OUT: U2.4 U3.95 | length 741.1
  Top Layer w6: U3.95@1936.81,603.32 1937.25,603.32 1991.56,549 v1(1992,549) ; v1(2512,799) 2513.31,800.31 U2.4@2551.34,800.31
  Bottom Layer w6: v1(1992,549) 2079,636 2311,636 2474,799 v1(2512,799)
MISC_FC_IO: D7.3 R43.2 U3.94 | length 2543.9
  Top Layer w6: U3.94@1950.73,617.23 2024.29,543.68 2037.32,543.68 v1(2040,541) ; D7.3@4235.43,450 4266.46,450 4283.24,466.78 4283.24,471.7 4290.08,478.54 R43.2@4295,478.54 ; v1(4266,493) 4274.61,484.39 4281.16,484.39 R43.2@4288,477.54
  Bottom Layer w6: v1(2040,541) 2041,541 2079,579 2187,579 2216,550 2776.03,550 2798.03,572 2990.38,572 3002.38,584 3281.87,584 3291.87,594 3868.37,594 3940.37,522 4233,522 4261,494 v1@4273,494
NetC4_2: C4.2 U1.2 Y2.2 | length 301.5
  Top Layer w8: U1.2@1612.66,849.31 1679.69,849.31 1741,788 1741,759.2 Y2.2@1754,746.2 1845.8,746.2 C4.2@1852,740
NetC5_2: C5.2 U1.3 Y2.1 | length 250.1
  Top Layer w6: U1.3@1612.66,869 1727.2,869 Y2.1@1754,895.8 1849.48,895.8 C5.2@1851,897.32
NetC15_2: C15.2 U3.20 Y3.2 | length 197.8
  Top Layer w6: C15.2@1952.89,37.11 1952.89,41.99 Y3.2@2015.89,105 ; Y3.2@2058.89,99.02 U3.20@2131.68,171.81 ; Y3.2@2064.89,104 Y3.2@2064.89,104.92
NetC17_2: C17.2 U3.19 Y3.1 | length 291.8
  Top Layer w6: C17.2@1839.11,147.89 1847.2,147.89 Y3.1@1910.11,210.79 ; Y3.1@1953.11,203.89 1980,177 2042.22,177 2060.73,158.49 2087.49,158.49 2114.73,185.73 U3.19@2117.77,185.73
NetC30_1: C30.1 U10.13 | length 69.4
  Top Layer w6: U10.13@1140.02,514 1140.02,557.24 1143.54,560.76 1144.73,560.76 1157.48,573.51 C30.1@1157.48,575.48
NetC31_2: C31.2 C32.2 L3.2 U9.22 | length 253.6
  Top Layer w6: U9.22@846,263.77 881.21,263.77 C31.2@944.98,200 944.54,199.56 L3.2@944.54,72
NetC33_1: C33.1 U12.9 | length 43.2
  Top Layer w12: C33.1@822.01,714.5 U12.9@865.23,714.5
NetC33_2: C33.2 U11.4 | length 340
  Top Layer w12: U11.4@570,815.31 570,752.54 646.08,676.46 786,676.46 C33.2@807,655.46
NetC34_1: C34.1 D2.3 R23.2 U13.3 | length 304
  Top Layer w6: R23.2@147,554.46 146,553.46 D2.3@146,529.59 233.35,529.59 251.7,511.24 251.7,496.51 U13.3@249.13,493.94 318.06,493.94 347.48,464.52 C34.1@347.48,428
NetC34_2: C34.2 R19.1 | length 109.8
  Top Layer w6: C34.2@406.54,428 410.61,432.07 410.61,451.2 421.4,462 R19.1@476.46,462 476.46,457.08 R19.1@469.61,450.24
NetC35_1: C35.1 U12.7 | length 152.3
  Top Layer w12: C35.1@824,893 824,792.32 838.82,777.5 U12.7@865.23,777.5
  Top Layer w16: C35.1@824,893 C35.1@827,896
NetC35_2: C35.2 U11.2 | length 274.5
  Top Layer w6: U11.2@670,815.31 670.53,814.79 670.53,769.47 682,758 748,758 767.94,777.94 C35.2@767.94,896
NetC36_1: C36.1 U9.5 | length 90.7
  Top Layer w6: C36.1@529.52,301 529.52,302.2 542.27,314.95 U9.5@613.72,314.95
NetC36_2: C36.2 C37.2 R20.1 | length 103.7
  Top Layer w6: C37.2@426,303.46 428.46,301 470.46,301 470.46,302.97 485.46,317.96 R20.1@485.46,353
NetC38_1: C38.1 C41.1 R21.1 | length 110.3
  Top Layer w8: C38.1@365,246 409.52,246 415,240.52 416.48,242 R21.1@472.46,242
NetC38_2: C38.2 C39.2 R22.2 TP12.1 U9.7 U14.3 | length 774.1
  Top Layer w6: C38.2@365,305.06 C38.2@365,306.03 365,382 382.91,399.91 470.81,399.91 v1(497.89,427) ; U14.3@526.29,135.51 526.54,135.76 526.54,161.38 ; TP12.1@555,162 527.16,162 526.54,161.38 ; v1(665,266) 661.6,266 659.37,263.77 U9.7@613.72,263.77 609.62,259.67 580.67,259.67 569,248 569,197 559,187 R22.2@526.54,187 526.54,161.38
  GND-PWR w6: v1(497.89,427) 556,427 665,318 v1(665,266)
NetC43_2: C43.2 L4.1 U14.5 | length 130.5
  Top Layer w6: L4.1@310,67.41 431.01,67.41 U14.5@437.71,60.7
NetC49_1: C49.1 D6.2 L6.1 U15.15 | length 740.6
  Top Layer w12: U15.15@3198.25,513.5 3201.11,510.65 3232.19,510.65 3239.84,503 v1(3242,503) ; C49.1@3301,304.48 3373.62,304.48 L6.1@3374.13,305 3367,312.13 v1(3367,411) ; v1(3591,269.25) 3596.63,263.61 D6.2@3653,263.61
  Bottom Layer w12: v1(3242,503) 3275,503 v1(3367,411) 3508.75,269.25 v1(3591,269.25)
NetC49_2: C49.2 D5.2 U15.13 | length 233.6
  Top Layer w16: U15.13@3198.25,462.32 3300.71,462.32 D5.2@3301,462.61 ; C49.2@3301,363.54 D5.2@3301,462.61 ; D5.2@3323.39,485 D5.2@3301,462.61
NetC50_2: C50.2 C51.2 C52.2 D5.1 L6.2 R27.2 R28.2 | length 658.8
  Top Layer w20: R28.2@3272,135.46 R28.2@3276.39,135.46 ; R27.2@3276.54,84 3276.54,135.3 R28.2@3276.39,135.46 ; D5.1@3496.61,485 3496.61,324.25 L6.2@3515.87,305 3530,290.87 C52.2@3530,159.45 C50.2@3447,159.45 C51.2@3365,159.45 3357.71,152.16 3319.16,152.16 3302.46,135.46 R28.2@3276.39,135.46
NetC53_2: C53.2 U15.19 | length 139.1
  Top Layer w8: C53.2@3112.54,693 3112.54,656.46 3153.13,615.87 U15.19@3198.25,615.87
NetC54_2: C54.2 U15.7 | length 66.6
  Top Layer w8: C54.2@2899.54,487.4 2900.05,487.91 U15.7@2965.97,487.91
NetC55_2: C55.2 R33.1 | length 40.9
  Top Layer w10: C55.2@3043.54,740 R33.1@3084.46,740
NetC56_2: C56.2 R34.1 | length 52.6
  Top Layer w10: C56.2@2840.46,384.54 2841.46,385.53 R34.1@2841.46,436.73
NetC60_2: C60.2 R37.1 R38.2 U16.3 | length 177.9
  Top Layer w6: R38.2@3089.54,902 3089.54,797.01 C60.2@3088.54,796 3118.11,796 3131.98,809.87 3131.98,814.79 3140.79,823.6 U16.3@3145.71,823.6
NetC61_2: C61.2 R39.1 R40.2 U18.3 | length 151.7
  Top Layer w6: U18.3@3694.29,897.4 3739.61,897.4 R39.1@3746.46,904.24 ; R39.1@3746.46,905 R39.1@3746.46,904.24 ; C61.2@3750.46,810 3746.46,814.01 R40.2@3746.46,860 R39.1@3746.46,904.24
NetC64_2: C64.2 R41.1 R42.2 U19.3 | length 198.5
  Top Layer w6: R41.1@3783.54,690 R42.2@3826.46,690 ; C64.2@3825.46,750 3825.46,690.99 R42.2@3826.46,690 ; U19.3@3889.29,632.4 3886.77,634.93 3867.07,634.93 3831.9,670.1 3831.9,684.56 R42.2@3826.46,690
NetD1_A: D1.A R7.1 | length 81.2
  Top Layer w6: R7.1@4339,420.46 4365.93,420.46 4376.74,431.27 4377.72,431.27 4390.47,444.02 D1.A@4390.47,445 4390.47,445.98 D1.A@4377.72,458.73
NetD4_1: D4.1 L5.2 U15.16 | length 486.8
  Top Layer w12: D4.1@3313.27,609.89 D4.1@3323.39,620
  Top Layer w16: U15.16@3198.25,539.09 3276.8,539.09 3313.27,575.56 D4.1@3313.27,609.89 ; D4.1@3323.39,620 3339.13,620 3364.6,645.46 3364.6,661.21 3385.39,682 3441,682 3483.26,724.26 3499.34,724.26 3520.87,745.79 L5.2@3520.87,795
NetJ3_4: J3.4 R43.1 | length 311.9
  Top Layer w6: J3.4@4200.36,180.31 4254.31,180.31 4274,200 4274,371 4287,384 4287,413.46 R43.1@4295,421.46
NetQ1_1: Q1.1 U15.11 | length 157.4
  Top Layer w6: Q1.1@3081.11,347.4 3081.11,371.11 3121.14,411.14 U15.11@3198.25,411.14
NetR7_2: R7.2 U3.72 | length 2553.4
  Top Layer w6: v1(2247,530) 2247,733.87 2311.13,798 2312.45,798 U3.72@2340.48,826.03 ; R7.2@4339,477.54 4360,477.54 4365,482.54 v1(4365,483)
  Bottom Layer w6: v1@2244,532 2248,528 2771,528 2789,546 3243.87,546 3250.87,553 3795,553 3898,450 4332,450 v1(4365,483)
NetR10_2: R10.2 U3.98 | length 112.5
  Top Layer w8: R10.2@1797.83,591 1798.55,590.28 1813.54,590.28 1817.27,594 1862.61,594 U3.98@1895.05,561.56
NetR11_2: R11.2 U3.97 | length 143.2
  Top Layer w8: R11.2@1796.54,645.07 1796.54,641.84 1802.39,636 1848.45,636 U3.97@1908.97,575.48
NetR12_2: R12.2 U3.12 | length 282.2
  Top Layer w6: R12.2@1794.09,361 1794.09,356.08 1800.93,349.24 1805.85,349.24 1841.09,314 1871.78,314 1881.78,304 1926,304 1972,258 1995.16,258 U3.12@2020.33,283.17
NetR13_2: R13.2 U3.13 | length 279.5
  Top Layer w6: R13.2@1799.54,297 1804.54,302 1859.84,302 1869.84,292 1921.03,292 1979.03,234 1996,234 2031.25,269.25 U3.13@2034.25,269.25
NetR14_2: R14.2 U3.7 | length 216.6
  Top Layer w6: R14.2@1799.54,417.31 1799.54,412.39 1821.8,390.14 1821.8,380.95 1886.75,316 1913.97,316 U3.7@1950.73,352.77
NetR18_1: R18.1 U8.1 U8.2 U9.28 U12.1 U12.3 | length 630.9
  Top Layer w6: U9.28@846,417.31 841.4,417.31 835.54,423.17 R18.1@835.54,474 835.54,478.92 842.62,486 U8.2@912.71,486 U8.1@912.71,523.4 913.55,524.24 934.93,524.24 1066.5,655.82 1066.5,714.5 ; U12.1@1018.77,714.5 1066.5,714.5 ; U12.3@1018.77,777.5 1077.9,777.5 1081.42,773.98 1081.42,729.42 1066.5,714.5
NetR19_2: R19.2 U9.2 | length 140.9
  Top Layer w8: R19.2@533.54,462 533.54,457.08 556.92,457.08 564,450 564,401 573.28,391.72 U9.2@613.72,391.72
NetR20_2: R20.2 U9.4 | length 79.2
  Top Layer w8: R20.2@542.54,353 542.54,348.08 550.08,340.54 U9.4@613.72,340.54
NetR21_2: R21.2 U9.6 | length 105.6
  Top Layer w6: R21.2@529.54,242 529.54,245.03 536.39,251.87 544.87,251.87 580.67,287.67 612.03,287.67 U9.6@613.72,289.36
NetR25_1: R25.1 R26.2 U15.1 | length 140.6
  Top Layer w6: R26.2@2851,689.46 2903,689.46 R25.1@2904,690.46 2905.03,690.46 2911.87,683.61 2911.87,675.13 2939.68,647.31 2960.11,647.31 U15.1@2965.97,641.46
NetR28_1: R28.1 R31.2 U15.9 | length 443.1
  Top Layer w8: U15.9@2965.97,436.73 3010.75,436.73 3039,408.48 v1(3039,383) ; v1(3195,192) 3271.46,192 R28.1@3272,192.54
  Bottom Layer w6: v1(3039,383) 3039,348 v1(3195,192)
NetR30_2: R30.2 U15.6 | length 80.9
  Top Layer w8: R30.2@2898.54,539.09 2898.54,534.17 2904.39,528.33 2909.31,528.33 2924.13,513.5 U15.6@2965.97,513.5
NetR33_2: R33.2 U15.20 | length 133
  Top Layer w6: R33.2@3141.54,740 3141.54,680.37 3173.69,648.22 3173.69,647.31 3179.55,641.46 U15.20@3198.25,641.46
NetR34_2: R34.2 U15.8 | length 80.9
  Top Layer w8: R34.2@2898.54,436.73 2898.54,441.65 2904.39,447.5 2919.5,447.5 2934.32,462.32 U15.8@2965.97,462.32
NetR35_1: R35.1 R36.2 U15.10 | length 123.5
  Top Layer w6: R36.2@2958.54,330 2958.54,350.57 2965.97,358 ; U15.10@2965.97,411.14 2965.97,358 ; R35.1@3005,358.54 2966.51,358.54 2965.97,358
NetR37_2: R37.2 U17.1 | length 77.6
  Top Layer w10: U17.1@2979.23,804.6 2986.04,811.41 2993.41,811.41 3026.24,844.24 3028.61,844.24 3033.46,849.08 R37.2@3033.46,854
NetTP1_1: TP1.1 U1.9 | length 137.8
  Top Layer w6: TP1.1@1335,800 1370,800 1395.92,825.92 1395.92,838 1407.24,849.31 U1.9@1445.34,849.31
NetTP2_1: TP2.1 U3.93 | length 129.8
  Top Layer w6: TP2.1@1858,687 1908.81,687 U3.93@1964.65,631.15
NetTP3_1: TP3.1 U3.100 | length 46.1
  Top Layer w6: TP3.1@1844,497.27 1846.58,499.85 1846.58,513.09 U3.100@1867.22,533.72
NetTP4_1: TP4.1 U3.61 | length 99.1
  Top Layer w6: U3.61@2493.59,672.91 2510.29,689.62 2535.84,715.16 2535.84,728.84 TP4.1@2554,747
NetTP5_1: TP5.1 U3.64 | length 88.4
  Top Layer w6: U3.64@2451.83,714.67 2493,755.84 2493,767.63 TP5.1@2480,780.63
NetTP6_1: TP6.1 U3.28 | length 103.6
  Top Layer w6: U3.28@2326.56,130.05 2354.4,102.22 2354.4,41.4 TP6.1@2352,39
NetTP7_1: TP7.1 U3.37 | length 110.2
  Top Layer w6: U3.37@2451.83,255.33 2495,212.16 TP7.1@2495,163
NetTP8_1: TP8.1 U3.92 | length 98.5
  Top Layer w6: TP8.1@1912,716 1912,711.64 U3.92@1978.57,645.07
RS485_RX_IN_N: J4.6 R1.1 U2.8 | length 1654.6
  Top Layer w8: U2.8@2718.66,820 2774.47,820 2780.28,814.19 2780.28,812.22 2792.03,800.47 R1.1@2794,800.47 2823.72,800.47 2830.19,794 v1(2831,794)
  Top Layer w10: J4.6@4200.36,665.94 4203.42,669 v1(4244,669)
  Bottom Layer w6: v1(2831,794) 2845,808 3231,808 3242,819 3780.04,819 3808.04,791 3988.23,791 4110.23,669 v1(4244,669)
RS485_RX_IN_P: J4.3 R1.2 U2.9 | length 1624.7
  Top Layer w6: U2.9@2718.66,839.69 2774.16,839.69 2779.28,844.81 2779.28,846.78 2792.03,859.53 R1.2@2794,859.53
  Top Layer w8: R1.2@2794,859.53 2795.53,858 v1(2827,858)
  Top Layer w10: J4.3@4200.36,784.05 4243.05,784.05 4244,785 v1(4247,785)
  Bottom Layer w6: v1(2827,858) 2879,858 2915,822 3228.03,822 3239.03,833 3972,833 4020,785 v1(4247,785)
RS485_TX_OUT_N: J4.2 U2.7 | length 1867.9
  Top Layer w6: v1(2645,825) 2665,805 2678.7,805 2683.19,800.51 2718.47,800.51 U2.7@2718.66,800.31 ; J4.2@4200.36,823.42 4244.42,823.42 v1(4246,825)
  Bottom Layer w6: v1(2645,825) 2645,774 2656,763 2703.72,763 2818.72,878 2883,878 2897,892 2969.51,892 2980.51,881 3012.95,881 3013.95,880 3973,880 4028,825 v1(4246,825)
RS485_TX_OUT_P: J4.1 U2.6 | length 1743
  Top Layer w6: v1(2670,784) 2670.19,783.81 2685.16,783.81 2685.56,783.41 2689.26,783.41 2691.13,781.54 2717.76,781.54 U2.6@2718.66,780.63 ; J4.1@4200.36,862.8 4246.8,862.8 v1(4247,863)
  Bottom Layer w6: v1(2670,784) 2779,893 2833.7,893 2847.7,907 2975.72,907 2987.72,895 3018.75,895 3019.75,894 4001,894 4032,863 v1(4247,863)
RST: J1.10 J2.3 R8.1 U3.48 U4.2 | length 2412.9
  Top Layer w6: J2.3@1567,467 1604,430 1708,430 1719,441 v1(1719,442) ; J1.10@1657,235 J1.10@1657,243.49 ; J1.10@1668.5,254.99 J1.10@1657,243.49 ; v1(1689,269) 1676.99,269 1676.36,268.37 1668.5,268.37 1657,256.87 J1.10@1657,243.49 ; v1(2238,284) 2255,301 2255,401.61 2310.39,457 2364,457 v1(2366,459) ; v1(2531,461) 2533.03,458.97 2554.42,458.97 U3.48@2604.95,408.44 2639.39,374 v1(2641,374) ; v1(2788,424) 2788,458.97 U4.2@2787.4,459.57 2787.4,583.86 R8.1@2788.54,585
  Bottom Layer w6: v1(1689,269) 1747.13,269 1763.13,253 1801,253 1823,231 1829.08,231 1829.28,231.19 1962.22,231.19 1989.03,258 2212,258 v1(2238,284) ; v1(1719,442) 1732,455 1812,455 1832,435 1988.84,435 1998.84,425 2224.24,425 2258.24,459 v1(2366,459) 2368,461 v1(2531,461) ; v1(2641,374) 2713,374 2757,418 2784.49,418 v1@2787.73,421.25
RX_ENABLE: U2.2 U3.81 | length 517.4
  Top Layer w6: U3.81@2131.68,798.19 2135.79,798.19 2154.47,779.51 2155.49,779.51 v1(2210,725) ; v1(2455,830) 2473.58,830 2483.26,839.69 U2.2@2551.34,839.69
  Bottom Layer w6: v1(2210,725) 2234,701 2326,701 v1(2455,830)
SCL: J6.2 R2.1 U1.4 U3.83 U17.5 | length 3401.1
  Top Layer w6: J6.2@307.64,792.32 202.32,792.32 v1(200,790) 200,834 307.29,941.29 1406.69,941.29 1417.97,930 v1(1673,930) 1673,896 1665.68,888.68 U1.4@1612.66,888.68 ; v1(1913,933) 1910.49,930.49 1910.49,925.51 1942,894 2008,894 2023.7,878.3 2029.16,878.3 R2.1@2036,871.46 2036,843.84 2061.57,818.27 2061.57,812.62 U3.83@2103.85,770.35 ; v1(2829,826.03) 2844.97,842 U17.5@2882.77,842
  Bottom Layer w6: v1(1673,930) 1676,933 v1(1913,933) 1917,937 2482,937 2616,803 2616,780 2648,748 2750.97,748 v1(2829,826.03)
SDA: J6.1 R3.1 U1.5 U3.85 U17.4 | length 3135.6
  Top Layer w6: v1(236,757) 239.79,757 243.84,752.94 J6.1@307.64,752.94 ; v1(1535.49,875) 1568.86,908.37 U1.5@1612.66,908.37 ; v1(1942,874) 1944.54,871.46 R3.1@1978,871.46 1982.92,871.46 2009.14,845.24 2017.63,845.24 2037,825.87 2037,781.52 U3.85@2076.01,742.51 ; v1(2406.06,877) 2475,877 2536,938 2768,938 2826.6,879.4 U17.4@2882.77,879.4
  Bottom Layer w6: v1(236,757) 688,757 738,807 1071,807 1151,887 1520.62,887 1533.12,874.5 1941.5,874.5 v1(1942,874) 1945,877 v1(2406.06,877)
SPI_CLK: U3.16 U9.18 U10.12 | length 2269.8
  Top Layer w6: v1(821,536) 792.67,536 784.67,544 760.13,544 721,504.87 721,220 784,157 805.03,157 809.44,161.41 U9.18@846,161.41 ; v1(1151,426) 1165.61,440.61 U10.12@1165.61,514 ; v1(2015,394) 2042.13,394 2066.53,369.6 2118.4,369.6 v1(2139,349) 2139,290.48 U3.16@2076.01,227.49
  Bottom Layer w6: v1(821,536) 894,536 1007,423 1148,423 v1(1151,426) 1372.87,426 1466.51,332.36 1539.55,332.36 1565.91,306 1615.03,306 1663.03,354 1845,354 1876,385 1984.94,385 1993.94,394 v1(2015,394)
SPI_SDIN: U3.47 U9.20 U10.10 | length 2393.4
  Top Layer w6: v1(801,211) 802.59,212.59 U9.20@846,212.59 ; U10.10@1216.8,514 1216.8,469.99 1221,465.79 v1(1221,462) 1221,457 1293,385 1293,173 v1(1294,172) ; v1(2416,412) 2416,412.6 2437.4,434 2551.55,434 U3.47@2591.03,394.52
  Bottom Layer w6: v1(801,211) 841.03,211 899.03,153 1019.13,153 1020.13,152 1035.87,152 1036.87,153 1198,153 1216.79,171.79 1293.79,171.79 v1(1294,172) ; v1(1221,462) 1242,483 1335.13,483 1412.13,406 1951.13,406 1968.13,423 1983.87,423 1993.87,413 2415,413 v1(2416,412)
SPI_SDO: U3.5 U9.21 U10.9 | length 2315.8
  Top Layer w6: v1(768,525) 733,490 733,281.42 777.42,237 v1(802,237) 803.18,238.18 U9.21@846,238.18 ; U10.9@1242.39,514 1242.39,544.39 1266,568 v1(1266,592) ; v1(1708,212) 1708,230 1740.87,262.87 1757.87,262.87 v1(1769,274) ; v1@1895.65,353.36 U3.5@1922.89,380.6
  Bottom Layer w6: v1(768,525) 806,563 921,563 1000,484 1063,484 1109,530 1204,530 v1(1266,592) ; v1(802,237) 804,235 895,235 929.54,200.46 1500.54,200.46 1541,160 1576,160 1628,212 v1(1708,212) ; v1(1769,274) 1809.23,274 v1(1888,352.77)
SPIFI_CS: R9.1 U3.35 U5.1 | length 482.2
  Top Layer w6: U3.35@2423.99,227.49 2458.48,193 v1(2462,193) ; R9.1@2684.06,311.01 2684.33,310.73 U5.1@2684.33,229 v1(2735,229)
  Bottom Layer w6: v1(2462,193) 2463.51,193 2472.51,184 2693,184 2734,225 2734,228 v1(2735,229)
SPIFI_IO0: U3.38 U5.5 | length 637.6
  Top Layer w6: U3.38@2465.75,269.25 2469.26,269.25 2511,227.51 v1(2511,224) ; v1(2837,170) 2837,150.87 2908.87,79 U5.5@2975.67,79
  Bottom Layer w6: v1(2511,224) 2514.51,224 2532.51,206 2674,206 2717,249 2758,249 v1(2837,170)
SPIFI_IO1: U3.40 U5.2 | length 770.8
  Top Layer w6: v1(2326,298) 2385,298 2414.87,327.87 2462.81,327.87 U3.40@2493.59,297.09 ; U5.2@2684.33,179 v1(2746,179)
  Bottom Layer w6: v1(2326,298) 2329,295 2329,237 2402.9,163.1 2730.1,163.1 v1(2746,179)
SPIFI_IO2: U3.44 U5.3 | length 750.5
  Top Layer w6: v1(2516,414) 2516,386.03 U3.44@2549.27,352.77 ; U5.3@2684.33,129 2733.51,129 2823.51,219 v1(2825,219)
  Bottom Layer w6: v1(2516,414) 2516,383 2552,347 2809,347 2854,302 2854,248 v1(2825,219)
SPIFI_IO3: U3.42 U5.7 | length 609.8
  Top Layer w6: v1(2490,357) 2490,356.36 U3.42@2521.43,324.93 ; v1(2830,287) 2934.75,182.25 2972.42,182.25 U5.7@2975.67,179
  Bottom Layer w6: v1(2490,357) 2516,331 2795,331 2830,296 v1(2830,287)
SPIFI_SCK: U3.56 U5.6 | length 1087.8
  Top Layer w6: v1(2370,321) 2370,416.89 2539.72,586.61 2546.48,586.61 U3.56@2563.19,603.32 ; v1(2798,287) 2797.99,282.01 2872,208 2872,151 2894,129 U5.6@2975.67,129
  Bottom Layer w6: v1(2370,321) 2374,321 2408,287 v1(2798,287)
START: TP10.1 U3.29 U9.13 U10.3 | length 2252.2
  Top Layer w6: U9.13@613.72,110.23 672.44,110.23 678.21,116 v1(682,116) ; U10.3@1165.61,291.56 1165.61,258.39 v1(1167,257) ; v1(2262,227) 2262,222.45 U3.29@2340.48,143.97 2395,89.45 TP10.1@2395,70
  Bottom Layer w6: v1(682,116) 708,90 824,90 830,96 830,124.13 764,190.13 764,232 797,265 1005,265 1038,232 1142,232 v1(1167,257) 1187,277 1397.5,277 1428.86,308.36 1529.61,308.36 1587.97,250 1749.16,250 1760.16,239 1786.95,239 1806.95,219 1834.05,219 1834.25,219.19 1967.19,219.19 1990,242 2247,242 v1(2262,227)
STOP: TP11.1 U7.1 U7.2 U9.14 U10.4 | length 880
  Top Layer w6: TP11.1@613,47 613.72,47.72 U9.14@613.72,84.64 665.36,84.64 v1(666,84) ; v1(1140,87) 1135,87 1141,93 1141,143 1153,155 1192,155 1206,169 U7.2@1206,209.29 ; U10.4@1191.2,291.56 v1(1191.2,243) 1191.2,226.54 1194.72,223.02 1197.19,223.02 1206,214.21 U7.2@1206,209.29 ; U7.1@1243.4,209.29 U7.2@1206,209.29
  Bottom Layer w6: v1(666,84) 674,76 941.62,76 953.62,88 1139,88 v1(1140,87)
SWDCLK: J1.4 J2.4 R16.1 U3.24 | length 1205.6
  Top Layer w6: v1(1427.87,280.5) 1427.87,377.87 J2.4@1517,467 ; J1.4@1507,235 v1(1507,289.36) ; v1(1776,220) 1779,217 v1(1779,97) ; v1(2133,83) 2152.13,83 2185.27,116.14 U3.24@2187.36,116.14
  Bottom Layer w6: v1(1427.87,280.5) 1431.66,280.5 1438.66,287.5 1505.14,287.5 v1(1507,289.36) 1531.64,289.36 1583,238 1744.19,238 1759.51,222.68 v1@1772.32,222.68 ; v1(1779,97) 1936,97 1950,83 v1(2133,83)
SWDIO: J1.2 J2.2 R17.1 U3.25 | length 1302.8
  Top Layer w6: R17.1@1388,211.3 R17.1@1395.16,218.46 ; v1(1401.93,57) 1401.93,64.93 1414,77 1414,199.61 R17.1@1395.16,218.46 ; J2.2@1517,410.24 J2.2@1517,417 1457,357 J1.2@1457,235 1407.54,235 1402.76,230.22 1402.76,225.3 1395.92,218.46 R17.1@1395.16,218.46 ; v1(2170,74) 2170,70.93 U3.25@2201.28,102.22
  Bottom Layer w6: v1(1401.93,57) 1774,57 1787,44 2140,44 v1(2170,74)
SWO: J1.6 J2.6 R15.1 U3.23 | length 1878.2
  Top Layer w6: v1@1369,83 1362,90 v1(1362,246) 1346,262 1346,360.13 1364,378.13 1364,456 1425,517 J2.6@1517,517 J2.6@1512.22,521.78 ; v1(1554,182) 1557,185 J1.6@1557,235 1557.62,235.62 1557.62,277.99 1579.64,300 1648,300 1667.46,319.46 R15.1@1667.46,334.99 ; v1(2118,106) 2119,105 2148.39,105 U3.23@2173.44,130.05 U3.23@2169.33,130.05
  Bottom Layer w6: v1(1362,246) 1490,246 v1(1554,182) ; v1@1369,81 1714.91,81 1757.91,124 1948,124 1966,106 v1(2118,106)
  other v1: 1369,80
TDC_ENABLE: U3.66 U9.15 U10.1 | length 2387.1
  Top Layer w6: U9.15@848.64,82 U9.15@846,84.64 854.49,84.64 860.34,78.78 860.34,70.29 875.64,55 v1(883,55) ; v1(1072,531) 1098,505 1098,340.61 1114.43,324.17 U10.1@1114.43,291.56 1114.43,257.43 v1(1114,257) 1114,253.21 1126,241.21 1126,106.02 1112,92.02 1112,76 v1(1100,64) ; v1(2012,501) 2047.99,501 2057.99,511 2269.06,511 2344,585.94 2344,662.52 U3.66@2423.99,742.51
  Bottom Layer w6: v1(883,55) 973.33,55 981.33,47 1083,47 v1(1100,64) ; v1(1072,531) 1163,622 1203.87,622 1204.87,623 1581.13,623 1600.13,642 1789,642 1930,501 v1(2012,501)
TDC_RESET: U3.63 U9.17 | length 2622.4
  Top Layer w6: v1(702,484) 702,195 v1(759,138) 761.18,135.82 U9.17@846,135.82 ; v1(1377,675) 1377,591 v1(1391,577) ; v1(2007,461) 2009.68,458.32 2019.72,458.32 2021,457.04 2276.04,457.04 2386,567 2386,621 U3.63@2465.75,700.75
  Bottom Layer w6: v1(702,484) 702.16,484.16 702.16,503 777.16,578 911,578 1005,672 1374,672 v1(1377,675) ; v1(1391,577) 1483,485 1669,485 1715.97,531.97 1829.03,531.97 1900,461 v1(2007,461)
TDC_TRIGGER: TP9.1 U3.55 U9.16 U10.2 | length 2331.2
  Top Layer w6: v1(804,109) 844.77,109 U9.16@846,110.23 ; TP9.1@1062,308 v1(1085,308) ; v1(1139,328) 1139,292.58 U10.2@1140.02,291.56 ; v1(1383,389) 1383,404 v1(1412,433) ; v1(2469,480) 2469,481.29 U3.55@2577.11,589.4
  Bottom Layer w6: v1(804,109) 801.32,111.68 793.81,111.68 793.49,112 747,112 728,131 728,221 815,308 v1(1085,308) 1119,308 v1(1139,328) 1156,311 1237,311 1274.66,348.66 1342.66,348.66 v1(1383,389) ; v1@1412,434.5 1680.5,434.5 1723,477 1806.97,477 1836.97,447 1993.81,447 1998.81,442 2224.27,442 2262.27,480 v1(2469,480)
TX_ENABLE: U2.3 U3.73 | length 257.2
  Top Layer w6: U3.73@2326.56,839.95 2330.67,839.95 2350.8,860.08 2386.05,860.08 2435.13,811 2471.55,811 2480.55,820 U2.3@2551.34,820
US_CLK.TDC1000_CLK: U1.10 U9.25 | length 1235.6
  Top Layer w6: v1(761,385) 760,384 760,371 790.46,340.54 U9.25@846,340.54 ; v1(1335,760) 1353.07,760 1422.7,829.63 U1.10@1445.34,829.63
  Bottom Layer w6: v1(761,385) 709.54,385 683,411.54 683,558 822,697 1293,697 1335,739 v1(1335,760)
US_CLK.TDC7200_CLK: U10.5 Y1.3 | length 544.5
  Top Layer w6: U10.5@1216.8,291.56 1219,293.76 1219,332 v1(1216,335) 1216,362 v1(1238,384) ; v1(1345,386) 1345,465.68 1447,567.68 1447,660.48 Y1.3@1435.52,649
  Bottom Layer w6: v1(1238,384) 1343,384 v1(1345,386)
US_OUT: J5.3 U11.5 U11.6 U11.7 U11.8 U13.1 | length 725.8
  Top Layer w20: U13.1@249.13,612.06 392.83,612.06 ; J5.3@406.43,848 396.74,838.31 395.76,838.31 385,827.56 385,619.89 392.83,612.06 ; U11.8@720,604.68 U11.7@670,604.68 U11.6@620,604.68 U11.5@570,604.68 570,610.24 568.19,612.06 392.83,612.06
US_TX_BUF: J3.5 U8.4 | length 3838.6
  Top Layer w6: U8.4@1001.29,448.6 1002.69,450 v1(1026,450) ; v1(1340,107) 1334,113 1334,314.87 1326,322.87 1326,420 1333,427 1333,544.29 v1(1343,554.29) ; v1(4154.32,143) 4156.37,140.94 J3.5@4200.36,140.94
  Bottom Layer w6: v1(1026,450) 1045.97,450 1113.97,518 1306.71,518 v1(1343,554.29) ; v1(1340,107) 1403.96,107 1417.96,93 1709.94,93 1762.94,146 2278,146 2355.14,68.86 2761.08,68.86 2766.93,63 3008.03,63 3024.03,47 3199,47 3323,171 4126.32,171 v1(4154.32,143)
VCOM: C39.1 C42.2 R22.1 U9.3 | length 623.5
  Top Layer w6: C39.1@534.06,402 534.06,400.03 546.8,387.28 548.77,387.28 569.92,366.13 U9.3@613.72,366.13 647.53,366.13 662,380.6 662,446.49 661.68,446.81 661.68,454.32 v1(659,457) 659,487.06 C42.2@655.06,491
  Bottom Layer w6: v1(487,168) 487,285 v1(659,457)
VIN_MONITOR: U3.26 U18.1 U18.4 | length 2334.8
  Top Layer w6: U3.26@2298.72,102.22 2296.78,102.22 2229,170 2229,196.87 2234,201.87 2234,227.87 2291,284.87 2291,355.32 2429,493.32 v1(2429,590) ; v1(2567,716) 2603.32,716 2626.32,739 2669.68,739 2689.68,719 2762.13,719 2774.13,707 v1(2777,707) ; U18.4@3605.71,897.4 3605.71,876.29 3659.4,822.6 U18.1@3694.29,822.6 3700.7,816.19 3700.7,805.3 v1(3770,736)
  Bottom Layer w6: v1(2429,590) 2555,716 v1(2567,716) ; v1(2777,707) 2870,707 2920,657 3497,657 3515,639 3635,639 3694,698 3732,698 v1(3770,736)
pads on no net: F1.1 F2.1 F3.1 J1.7 J1.8 J1.M J2.A J2.B J2.C U3.3 U3.4 U3.8 U3.17 U3.36 U3.46 U3.52 U3.57 U3.59 U3.60 U3.62 U3.65 U3.67 U3.68 U3.69 U3.70 U3.74 U3.77 U3.78 U3.84 U3.86 U3.88 U9.1 U9.8 U9.9 U9.10 U9.12 U9.27 U10.6 U10.8 Y1.1

## Polygon pours and split planes (outlines as drawn)
GND on GND-PWR "GND_L02_P008" (solid, remove dead copper, pour order 8): -250,1200 -250,-350 5375,-350 5375,1200
GND on GND (split plane): 4479.9,20.1 20.1,20.1 20.1,949.9 4479.9,949.9

## Keep-outs
Keep-Out Layer:
  the board outline again, w1

## Other copper
Bottom Layer:
  text "a" at 200,41 h275

## Silkscreen, mask and mechanical layers (free items; w line width, h text height)
Top Overlay:
  circle w20: c1414,37 r6
  text "Piezo" at 37,916 h100 r270
  text "RJ-45" at 4470,606 h100 r90
  text "MON" at 4469,99 h100 r90